# Altium PCB SuperCapCtrl.PcbDoc (part 1 of 2)
Units mil, origin at the board's own origin, x right, y up, seen from the top; angles counter-clockwise.
Board outline 2882.05 x 1582.83 mil, 4 copper layers (Top Layer, Layer 1, Layer 2, Bottom Layer), stack 23.756 mil thick; 102 components, 59 nets, 335 pads, 336 vias.
Unrouted connection lines stored in the file: 2.
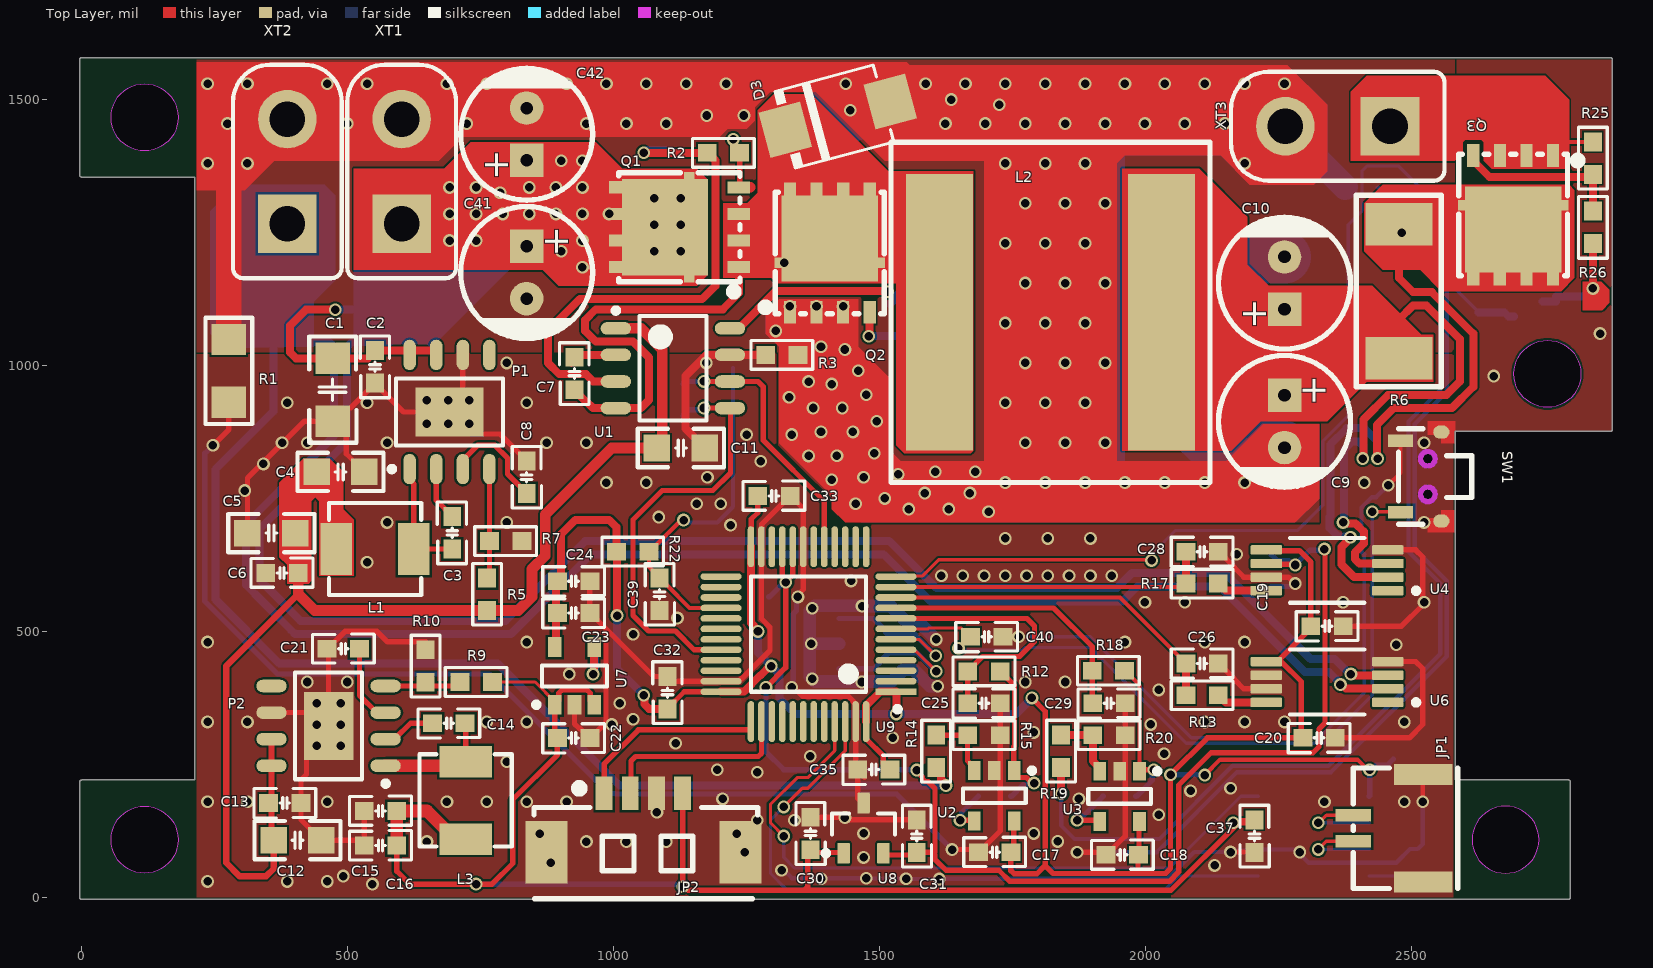
[diagram p0: Top Layer view]
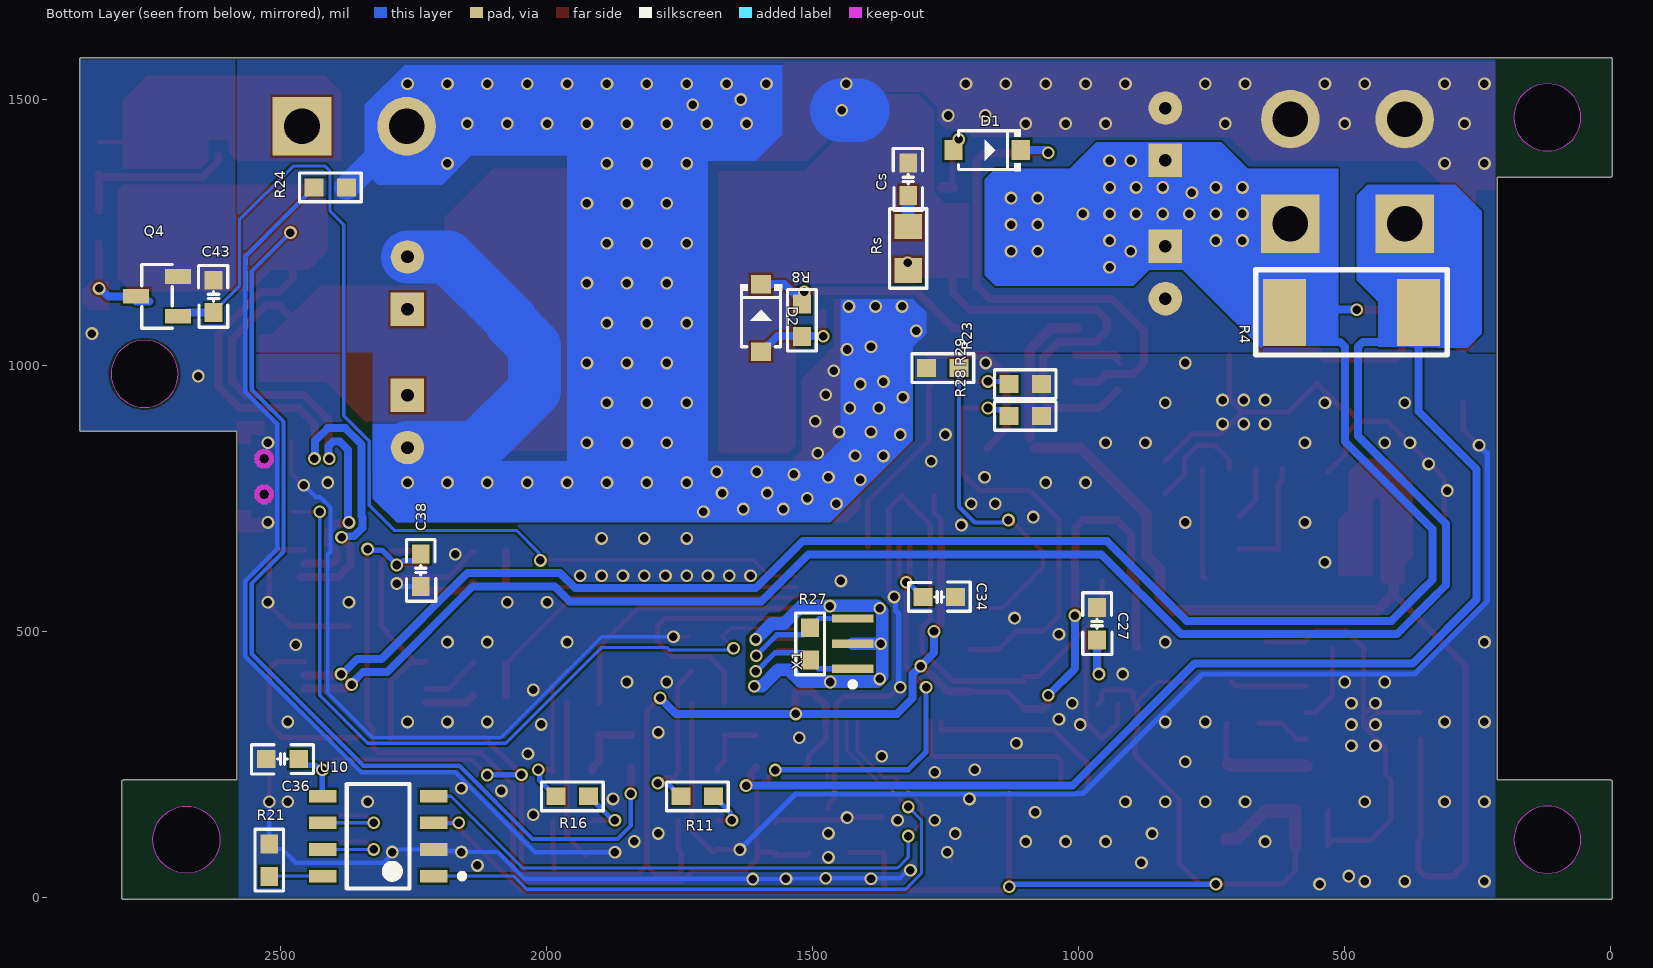
[diagram p1: Bottom Layer view, seen from below]
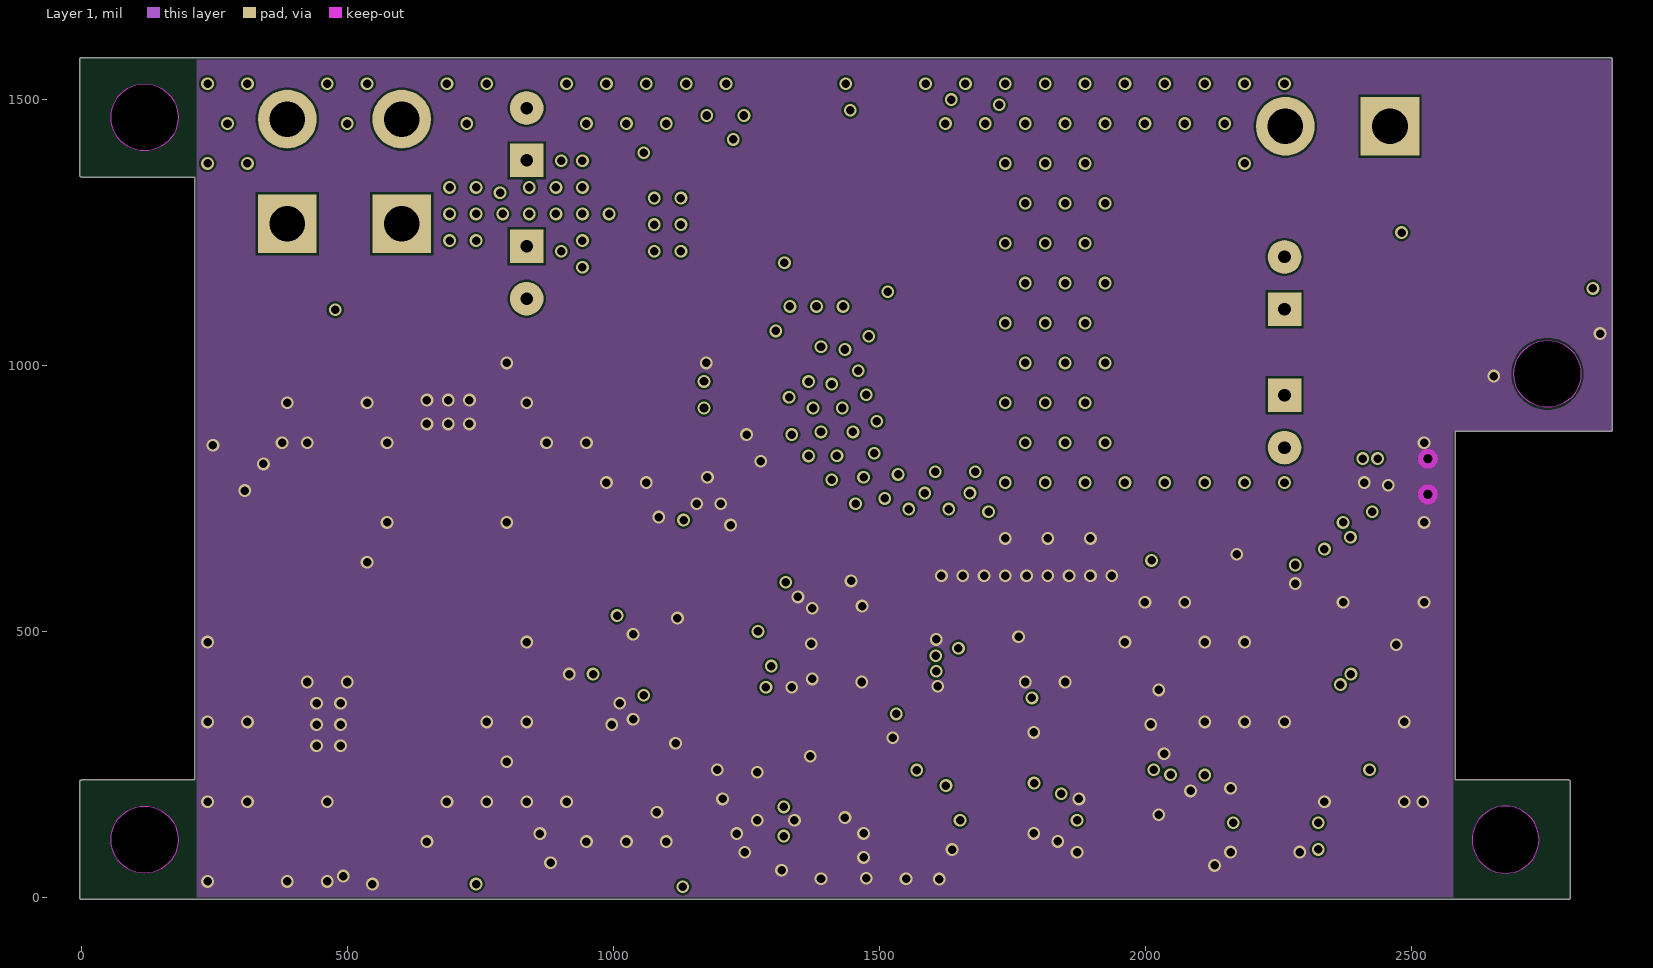
[diagram p2: Layer 1]
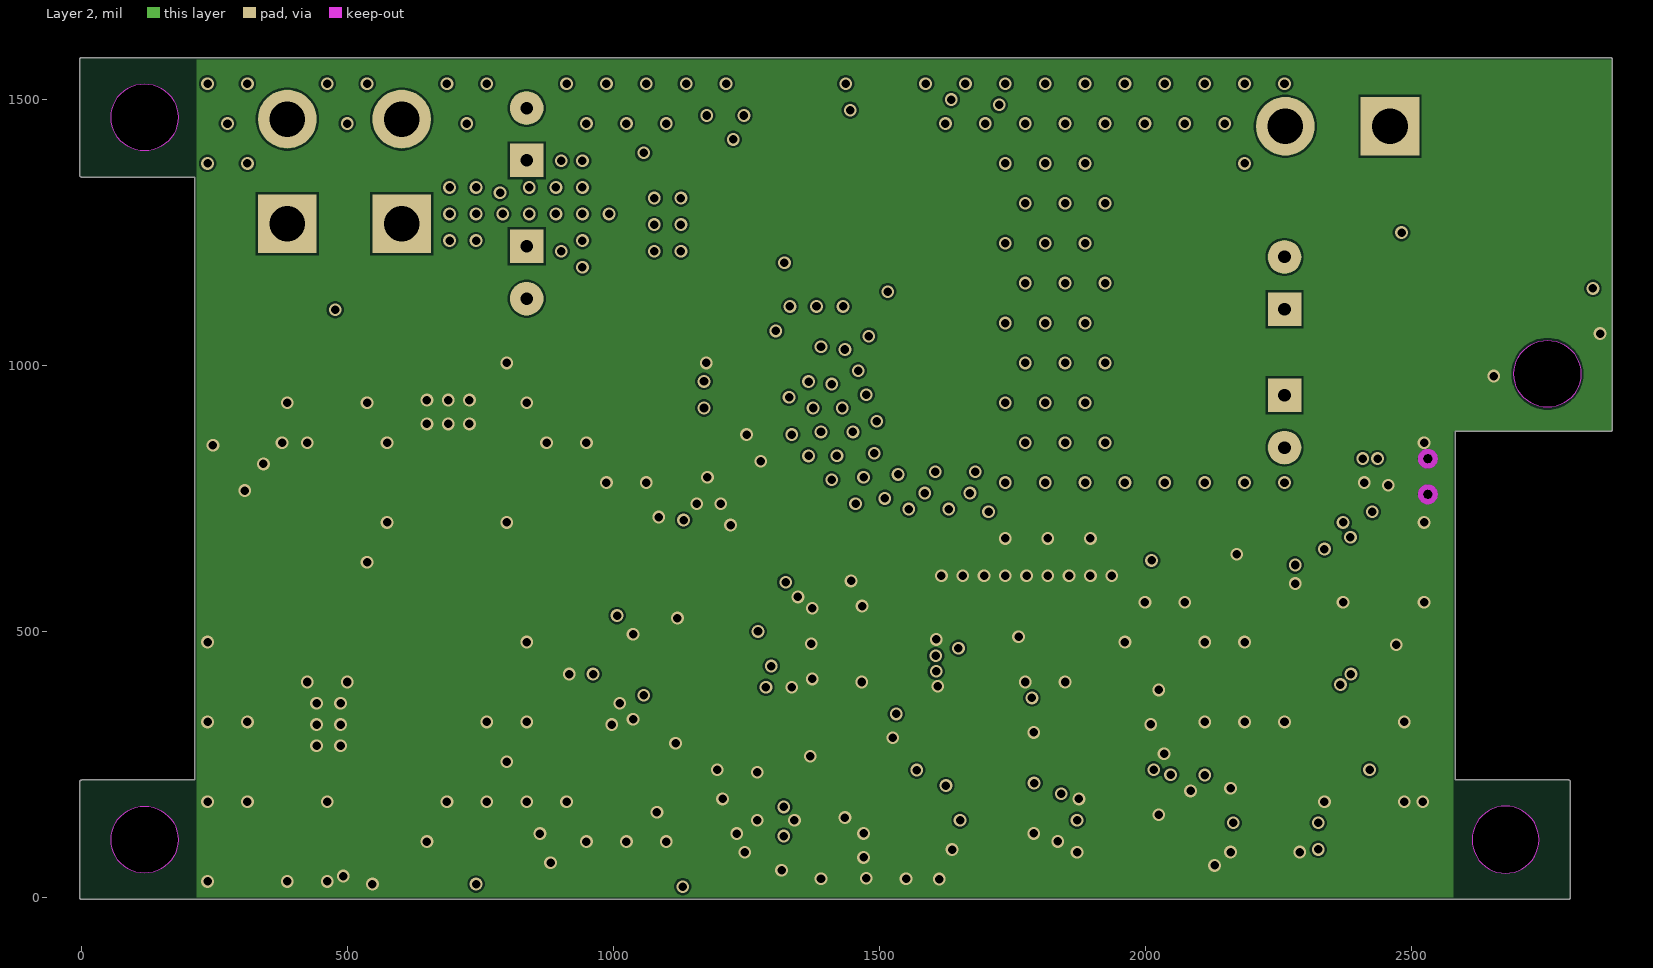
[diagram p3: Layer 2]
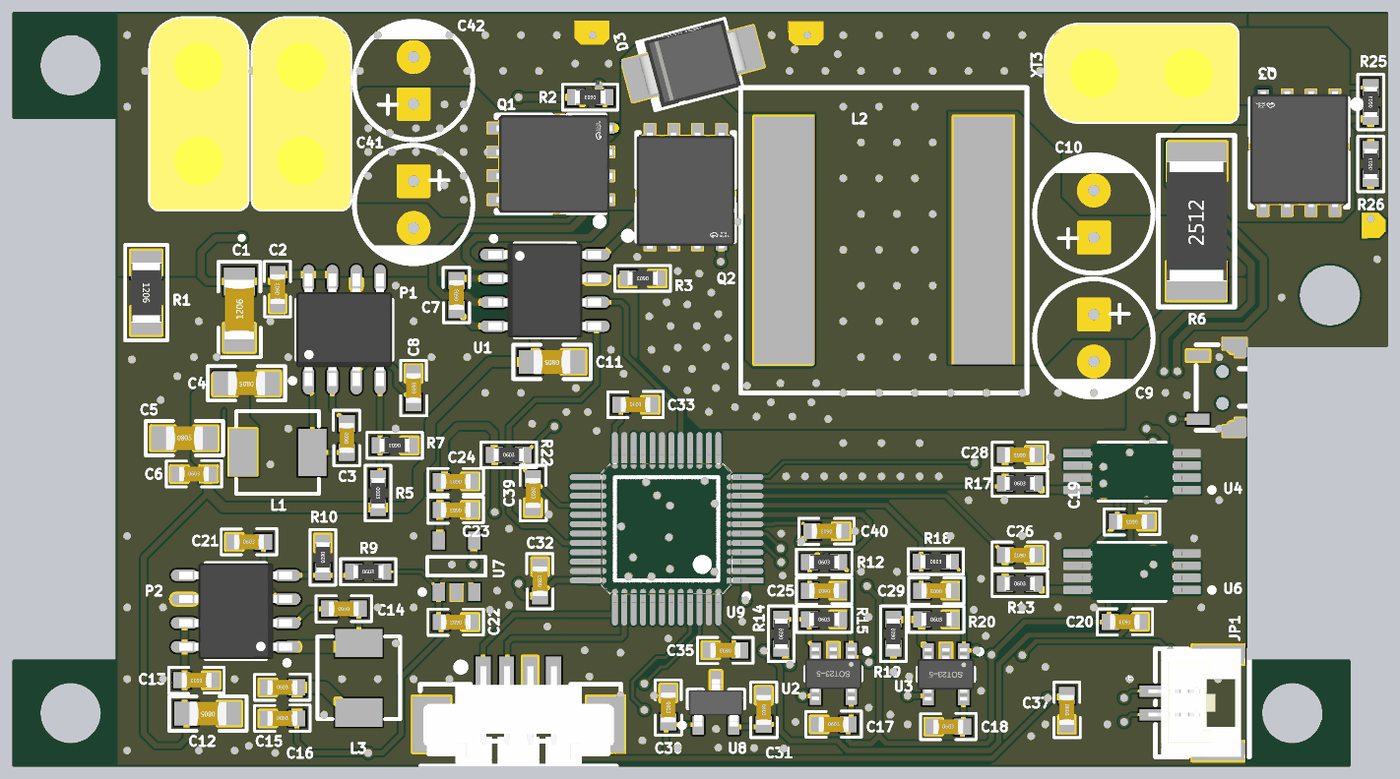
[diagram p5: 3D render of the assembled board from above, using the file's embedded part models]
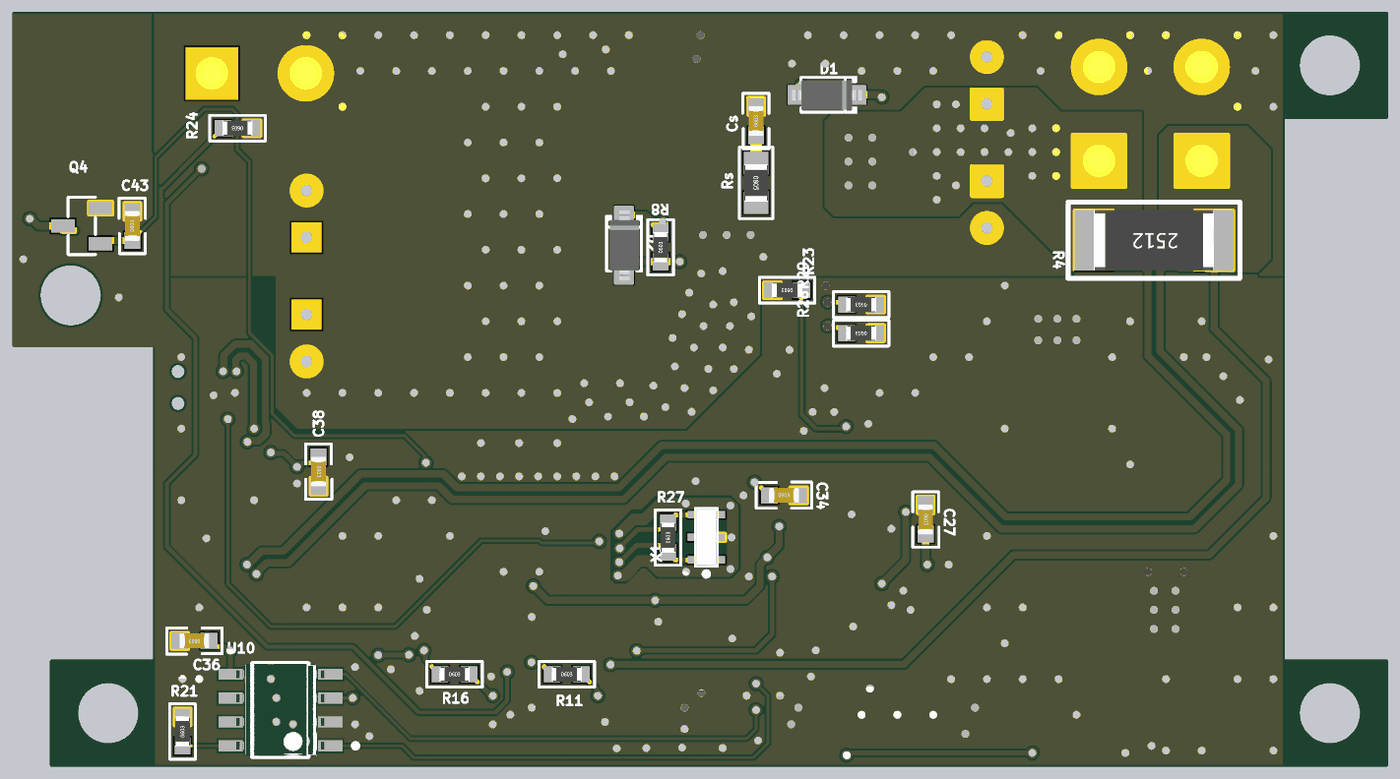
[diagram p6: 3D render of the assembled board from below, using the file's embedded part models]

## Layer stack, top to bottom
Top Solder: solder mask 0.4, Solder Resist, Dk 3.5
Top Layer: signal copper 1.4
Dielectric 2: prepreg 2.8, PP-006, Dk 4.1
Layer 1: signal copper 1.378
Dielectric 1: dielectric 12.6, FR-4, Dk 4.8
Layer 2: signal copper 1.378
Dielectric 3: prepreg 2.8, PP-006, Dk 4.1
Bottom Layer: signal copper 1.4
Bottom Solder: solder mask 0.4, Solder Resist, Dk 3.5

## Board outline
0,-4.02 cw(c0,0) -4.01,0 -4.01,216.54 cw(c0,216.54) 0,220.55 212.52,220.55 212.52,1354.25 0,1354.25 cw(c0,1358.27) -4.01,1358.27 -4.01,1574.8 cw(c0,1574.8) 0,1578.82 2874.02,1578.82 cw(c2874.02,1574.8) 2878.03,1574.8 2878.03,880 cw(c2874.02,880) 2874.02,875.98 2582.76,875.98 2582.76,220.55 2795.28,220.55 cw(c2795.28,216.54) 2799.29,216.54 2799.29,0 cw(c2795.28,0) 2795.28,-4.02
cut-out: 2755.91,921.26 cw(c2755.91,984.25) 2692.91,984.25 cw(c2755.91,984.25) 2755.91,1047.24 cw(c2755.91,984.25) 2818.9,984.25 cw(c2755.91,984.25)
cut-out: 2614.17,108.27 ccw(c2677.17,108.27) 2677.17,45.28 ccw(c2677.17,108.27) 2740.16,108.27 ccw(c2677.17,108.27) 2677.17,171.26 ccw(c2677.17,108.27)
cut-out: 118.11,1403.54 cw(c118.11,1466.54) 55.12,1466.54 cw(c118.11,1466.54) 118.11,1529.53 cw(c118.11,1466.54) 181.1,1466.54 cw(c118.11,1466.54)
cut-out: 118.11,45.28 cw(c118.11,108.27) 55.12,108.27 cw(c118.11,108.27) 118.11,171.26 cw(c118.11,108.27) 181.1,108.27 cw(c118.11,108.27)

## Design rules (kind name [scope] priority, off if disabled: settings)
Clearance [All] p1: gap=4 ignorepadtopadclearanceinfootprint=FALSE
DiffPairsRouting [All] p1: maxlimit=10 minlimit=10 mostfreqgap=10 toplayer_minwidth=4 toplayer_maxwidth=2222 toplayer_prefwidth=15 midlayer1_minwidth=4 midlayer1_maxwidth=2222 midlayer1_prefwidth=15 midlayer2_minwidth=4 midlayer2_maxwidth=2222 midlayer2_prefwidth=15 bottomlayer_minwidth=4 bottomlayer_maxwidth=2222 bottomlayer_prefwidth=15 maxuncoupledlength=500
HoleSize [All] p1: absolutevalues=TRUE maxlimit=44444 minlimit=1 maxpercent=80.000 minpercent=20.000
MinimumSolderMaskSliver [All] p1: minsoldermaskwidth=4
PolygonConnect [All] p1: connectstyle=Direct reliefconductorwidth=10 reliefentries=4 polygonreliefangle="90 Angle" airgapwidth=10
RoutingVias [All] p1: holewidth=15.75 width=23.62 viastyle="Through Hole" minholewidth=15.75 minwidth=23.62 maxholewidth=28 maxwidth=50
SilkToSilkClearance [All] p1: silktosilkclearance=0
SilkToSolderMaskClearance [IsPad] p1: minsilkscreentomaskgap=0 clearancetoexposedcopper=TRUE
SolderMaskExpansion [All] p1: expansion=4 istentingtop=FALSE
SupplyNets "Schematic Supply Nets_9" [InNet('VCAP')] p1: voltage=0.000
SupplyNets "Schematic Supply Nets_8" [InNet('IB_N')] p2: voltage=0.000
SupplyNets "Schematic Supply Nets_6" [InNet('PGND')] p3: voltage=0.000
SupplyNets "Schematic Supply Nets_5" [InNet('REF3V3')] p4: voltage=0.000
SupplyNets "Schematic Supply Nets_4" [InNet('IB_P')] p5: voltage=0.000
SupplyNets "Schematic Supply Nets_3" [InNet('12V0')] p6: voltage=0.000
SupplyNets "Schematic Supply Nets_2" [InNet('3V3')] p7: voltage=0.000
SupplyNets "Schematic Supply Nets_1" [InNet('5V0')] p8: voltage=0.000
SupplyNets "Schematic Supply Nets" [InNet('GND')] p9: voltage=0.000
Width [All] p1: maxlimit=11111 minlimit=4 preferedwidth=10
25 further rules are at their usual default settings.

## Classes and differential pairs
component class PwrObj: C1 C2 C3 C4 C5 C6 C7 C8 C9 C10 C11 C12 C13 C14 C15 C16 C17 C18 C19 C20 C21 C22 C23 C24 C25 C26 C27 C28 C29 C30 C31 C41 C42 C43 Cs D1 D2 D3 L1 L2 L3 P1 P2 Q1 Q2 Q3 Q4 R1 R2 R3 R4 R5 R6 R7 R8 R9 R10 R11 R12 R13 R14 R15 R16 R17 R18 R19 R20 R24 R25 R26 R28 R29 Rs U1 U2 U3 U4 U6 U7 U8 XT1 XT2 XT3
component class MainCtrl: C32 C33 C34 C35 C36 C37 C38 C39 C40 JP1 JP2 R21 R22 R23 R27 SW1 U9 U10 X1
differential pair IC: +IC_P -IC_N
differential pair IB: +IB_P -IB_N

## Components (designator, comment, footprint, x,y, rotation, side; value= is the part's Value field where it differs from the comment)
C1 "22uF" 1206M 471.54,954.45 r90 top
C2 "100nF" 0603M 551.54,997.37 r90 top
C3 "100nF" 0603M 696.54,685.32 r90 top
C4 "10uF" 0805M#1 486.54,799.8 r180 top
C5 "10uF" 0805M#1 356.54,684.8 r0 top
C6 "100nF" 0603M 376.54,609.8 r0 top
C7 "220nF" 0603M 926.54,984.8 r90 top
C8 "2.2uF" 0603M 836.54,789.8 r270 top
C9 "220uF/35V" D6.3*L12 2261.54,894.8 r270 top
C10 "220uF/35V" D6.3*L12 2261.54,1154.8 r90 top
C11 "10uF" 0805M#1 1126.54,844.8 r180 top
C12 "10uF" 0805M#1 405.68,107.3 r180 top
C13 "100nF" 0603M 381.75,177.3 r180 top
C14 "100nF" 0603M 690.25,327.3 r180 top
C15 "10uF" 0603M 561.75,162.3 r0 top
C16 "100nF" 0603M 561.75,97.3 r0 top
C17 "100nF" 0603M 1716.54,84.8 r0 top
C18 "100nF" 0603M 1956.54,79.8 r0 top
C19 "100nF" 0603M 2341.54,509.8 r180 top
C20 "100nF" 0603M 2326.54,299.8 r180 top
C21 "2.2uF" 0603M 491.75,467.3 r0 top
C22 "10uF" 0603M 924.84,299.4 r180 top
C23 "10uF" 0603M 924.84,534.4 r180 top
C24 "100nF" 0603M 924.84,594.4 r180 top
C25 "3.3nF" 0603M 1696.54,364.8 r180 top
C26 "3.3nF" 0603M 2106.54,439.8 r180 top
C27 "22nF" 0603M 964.84,514.4 r270 bottom
C28 "3.3nF" 0603M 2106.54,649.8 r180 top
C29 "3.3nF" 0603M 1931.54,364.8 r180 top
C30 "100nF" 0603M 1370,120 r270 top
C31 "100nF" 0603M 1570,115 r270 top
C32 "100nF" 0603M 1101.54,384.8 r90 top
C33 "100nF" 0603M 1301.54,754.8 r0 top
C34 "100nF" 0603M 1261.54,564.8 r180 bottom
C35 "100nF" 0603M 1489.49,240 r180 top
C36 "100nF" 0603M 2496.54,259.8 r0 bottom
C37 "100nF" 0603M 2205,115 r270 top
C38 "100nF" 0603M 2236.54,614.8 r270 bottom
C39 "100nF" 0603M 1086.54,569.8 r270 top
C40 "100nF" 0603M 1701.54,489.8 r180 top
C41 "220uF/35V" D6.3*L12 836.54,1174.8 r270 top
C42 "220uF/35V" D6.3*L12 836.54,1434.8 r90 top
C43 "100nF" 0603M 2626.54,1129.8 r90 bottom
Cs "100nF" 0603M 1320,1350 r90 bottom
D1 "1N4148W" SOD-123 1171.54,1404.8 r180 bottom
D2 "1N4148W" SOD-123 1596.78,1089.44 r90 bottom
D3 "NHS-D-SMD" SMB 1421.54,1469.8 r195 top
JP1 "NHS-1.25Conn-2p" GH1.25-2p-LT 2456.54,129.8 r90 top
JP2 "NHS-1.25Conn-4p" MX1.25-WT 1056.54,84.8 r0 top
L1 "HCMA-0420-100-M" 0420 551.54,654.8 r180 top
L2 "XAL1510-103MED" "New footprint 1" 1821.54,1099.8 r0 top
L3 "HCMA-0420-100-M" 0420 721.75,182.3 r270 top
P1 "JW5015A" SOP127P600X170_HS-9N 691.54,912.52 r90 top
P2 "JW5015A" SOP127P600X170_HS-9N 464.04,322.3 r180 top
Q1 "SiR182DP" "Copy of FAIR-SOT23-3_V" 1096.54,1259.8 r90 top
Q2 "SiR182DP" "Copy of FAIR-SOT23-3_V" 1406.54,1238.76 r0 top
Q3 "NHS-PMOS-PowerPAK_SO-8" "Copy of FAIR-SOT23-3_V" 2691.54,1255.84 r180 top
Q4 "SOT-23_NMOS" SOT-23 2731.54,1129.8 r180 bottom
R1 "0" 1206M 276.54,989.8 r270 top
R2 "10" 0603M 1206.54,1399.8 r180 top
R3 "0" 0603M 1316.54,1019.8 r180 top
R4 "2mR" 2512M 486.54,1099.8 r0 bottom
R5 "182k" 0603M 762.04,569.8 r270 top
R6 "1mR" 2512M 2476.54,1139.8 r90 top
R7 "13k" 0603M 797.04,669.8 r180 top
R8 "10" 0603M 1520,1085 r90 bottom
R9 "118k" 0603M 741.54,404.8 r0 top
R10 "22k" 0603M 646.54,434.8 r270 top
R11 "0" 0603M 1716.54,189.8 r180 bottom
R12 "1k" 0603M 1696.54,424.8 r0 top
R13 "1k" 0603M 2106.54,379.8 r0 top
R14 "825k" 0603M 1606.54,274.8 r90 top
R15 "100k" 0603M 1696.54,304.8 r0 top
R16 "0" 0603M 1951.54,189.8 r180 bottom
R17 "1k" 0603M 2106.54,589.8 r0 top
R18 "1k" 0603M 1930.46,425.88 r0 top
R19 "825k" 0603M 1841.54,274.8 r90 top
R20 "100k" 0603M 1931.54,304.8 r0 top
R21 "0" 0603M 2521.54,69.8 r90 bottom
R22 "10k" 0603M 1036.03,649.8 r0 top
R23 "10kNTC" 0603M 1255,995 r0 bottom
R24 "0" 0603M 2406.54,1334.8 r0 bottom
R25 "47k" 0603M 2841.54,1389.8 r90 top
R26 "47k" 0603M 2841.54,1259.8 r90 top
R27 "402k" 0603M 1504.43,476.38 r90 bottom
R28 "47k" 0603M 1100,905 r0 bottom
R29 "47k" 0603M 1100,965 r0 bottom
Rs "47k" 0805M#2 1320,1220 r270 bottom
SW1 "TS24CA" TS24CA-Footprint-1 2530.43,791.66 r270 top
U1 "MP1923GS" SOIC127P600X175-8N 1111.54,994.8 r0 top
U2 "AD8605ARTZ-REEL" ADI-RJ-5_L 1715.83,190.84 r270 top
U3 "AD8605ARTZ-REEL" ADI-RJ-5_L 1951.54,189.8 r270 top
U4 "INA240A1PWR" FP-PW0008A-MFG 2341.54,614.8 r180 top
U6 "INA240A3PWR" FP-PW0008A-MFG 2341.54,404.8 r180 top
U7 "RT9013-33GB" SOT95P279X130-5N 926.54,416.24 r90 top
U8 "REF3033AIDBZT" DBZ0003A_N 1470,130 r90 top
U9 "STM32G431CBT6" FP-LQFP48-5B-IPC_A 1366.54,494.8 r180 top
U10 "TJA1044GT/3Z" FP-SOT96-1-MFG 2316.54,114.8 r0 bottom
X1 "16M" MURA-CSTCE_G_A-3_V 1424.41,476.93 r90 bottom
XT1 "XT30F" XT30F 601.54,1364.8 r90 top
XT2 "XT30M" XT30F 386.54,1364.8 r90 top
XT3 "XT30M" XT30F 2361.54,1449.8 r180 top

## Footprints (in the part's own frame and the unit in brackets; to place one, negate y for a bottom-side part, rotate by r counter-clockwise, add the part's x,y. Pads: shape width x height; smd on the part's side, far side on the other; paste and mask are expansions set on the pad)
0420 [mm]
  rect 1.5x2.5 smd: 1(-1.85,0) 2(1.85,0)
  silkscreen extent -2.2,-2.2 2.2,2.2, body extent -2.2,-2.2 2.2,2.2, height 2
0603M [mm]
  rect 0.9x0.85 smd: 1(-0.775,0) 2(0.775,0)
  silkscreen extent -1.48,-0.69 1.48,0.71, body extent -0.8,-0.4 0.8,0.4, height 0.8
0805M#1 [mil]
  rect 50x50 smd: 1(-45,0) 2(45,0)
  silkscreen extent -81,-36 81,36, body extent -39,-26 39,26, height 51
0805M#2 [mil]
  rect 47.24x51.18 smd: 1(-41.34,0) 2(41.34,0)
  silkscreen extent -75,-35 75,35, body extent -39,-25 39,25, height 20
1206M [mm]
  rect 1.5x1.65 smd: 1(-1.5,0) 2(1.5,0)
  silkscreen extent -2.54,-1.14 2.54,1.12, body extent -1.6,-0.8 1.6,0.8, height 1.1
2512M [mm]
  rect 2.032x3.2 smd: 1(-3.2,0) 2(3.2,0)
  silkscreen extent -4.57,-2.03 4.57,2.03, body extent -3.2,-1.6 3.2,1.6, height 0.56
ADI-RJ-5_L [mm] "SOT-23, 5-Leads, Body 2.9x1.6mm, Pitch 0.95mm, IPC High Density"
  rect 0.9x0.6 smd: 1(-1.2,0.95) 2(-1.2,0) 3(-1.2,-0.95) 4(1.2,-0.95) 5(1.2,0.95)
  silkscreen extent -1.32,-1.5 0.35,1.93, body extent -1.4,-1.5 1.4,1.5, height 1.15
"Copy of FAIR-SOT23-3_V" [mm] "SOT23, 3-Leads, Body 3.12x1.5mm, Pitch 0.95mm"
  rect 0.95x0.5 smd paste-100 mask+0.05: D(-2.169,-1.16) D(2.169,-1.16)
  rect 0.58x1.08 smd paste-100 mask+0.05: D(-1.9,2.14) D(-0.63,2.14) D(0.64,2.14) D(1.91,2.14)
  rect 4.6x4.1 smd paste-100 mask+0.05: D(0,0)
  rect 0.58x1.079 smd paste-100 mask+0.05: G(1.905,-3.53) S(-1.905,-3.53) S(-0.635,-3.53) S(0.635,-3.53)
  silkscreen extent -3.2,-3.59 2.6,2.21, body extent -2.68,-3.96 2.67,2.19, height 1.12
D6.3*L12 [mm]
  rect 1.6x1.6 hole 0.6: 1(-1.25,0)
  round 1.6 hole 0.6: 2(1.25,0)
  silkscreen extent -3.15,-3.15 3.15,3.15, body extent -3.05,-3.05 3.15,3.05, height 12
DBZ0003A_N [mm] "SOT23, 3-Leads, Body 3.04x1.4mm, Pitch 0.95mm, IPC Medium Density"
  rrect17% 1x0.6 smd: 1(-1.2,0.95) 2(-1.2,-0.95) 3(1.2,0)
  silkscreen extent -1.32,-1.5 0.7,1.92, body extent -1.26,-1.46 1.26,1.46, height 0.96
FP-LQFP48-5B-IPC_A [mm]
  rect 1.955x0.312 smd paste+0 mask+0: 1(-4.175,2.75)
  rrect100% 1.955x0.312 smd paste+0 mask+0: 2(-4.175,2.25) 3(-4.175,1.75) 4(-4.175,1.25) 5(-4.175,0.75) 6(-4.175,0.25) 7(-4.175,-0.25) 8(-4.175,-0.75) 9(-4.175,-1.25) 10(-4.175,-1.75) 11(-4.175,-2.25) 12(-4.175,-2.75) 25(4.175,-2.75) 26(4.175,-2.25) 27(4.175,-1.75) 28(4.175,-1.25) 29(4.175,-0.75) 30(4.175,-0.25) 31(4.175,0.25) 32(4.175,0.75) 33(4.175,1.25) 34(4.175,1.75) 35(4.175,2.25) 36(4.175,2.75)
  rrect100% 0.312x1.955 smd paste+0 mask+0: 13(-2.75,-4.175) 14(-2.25,-4.175) 15(-1.75,-4.175) 16(-1.25,-4.175) 17(-0.75,-4.175) 18(-0.25,-4.175) 19(0.25,-4.175) 20(0.75,-4.175) 21(1.25,-4.175) 22(1.75,-4.175) 23(2.25,-4.175) 24(2.75,-4.175) 37(2.75,4.175) 38(2.25,4.175) 39(1.75,4.175) 40(1.25,4.175) 41(0.75,4.175) 42(0.25,4.175) 43(-0.25,4.175) 44(-0.75,4.175) 45(-1.25,4.175) 46(-1.75,4.175) 47(-2.25,4.175) 48(-2.75,4.175)
  silkscreen extent -4.38,-2.75 2.75,3.71, body extent -5.65,-5.65 5.65,5.65, height 0.25
FP-PW0008A-MFG [mm]
  rrect22% 1.5x0.45 smd paste+0 mask+0: 1(-2.9,0.975) 2(-2.9,0.325) 3(-2.9,-0.325) 4(-2.9,-0.975) 5(2.9,-0.975) 6(2.9,-0.325) 7(2.9,0.325) 8(2.9,0.975)
  silkscreen extent -4.38,-1.55 1.78,1.55, body extent -3.75,-1.8 3.75,1.8, height 0.25
FP-SOT96-1-MFG [mm]
  rect 1.3x0.6 smd paste+0 mask+0: 1(-2.65,1.905) 2(-2.65,0.635) 3(-2.65,-0.635) 4(-2.65,-1.905) 5(2.65,-1.905) 6(2.65,-0.635) 7(2.65,0.635) 8(2.65,1.905)
  silkscreen extent -4.12,-2.5 1.5,2.5, body extent -3,-2.45 3,2.45, height 1.75
GH1.25-2p-LT [mm]
  rect 1x2.8 smd: 0(-2.575,-1.675) 0(2.575,-1.675)
  rect 0.6x1.7 smd: 1(0.625,1.675) 2(-0.625,1.675)
  silkscreen extent -2.87,-3.33 2.87,1.68, body extent -2.88,-2.88 2.88,2.08, height 4.06
MURA-CSTCE_G_A-3_V [mm] "SMD, 3-Leads, Body 3.2x1.3mm, Pitch 1.2mm"
  rect 0.4x2 smd: 1(-1.2,0) 2(0,0) 3(1.2,0)
  silkscreen extent -2.07,-0.12 -1.83,0.13, body extent -1.6,-0.65 1.6,0.65, height 0.7
MX1.25-WT [mm]
  rect 2x3 smd: 0(-4.632,0) 0(4.632,0)
  rect 0.8x1.6 smd: 1(-1.889,2.811) 2(-0.639,2.811) 3(0.611,2.811) 4(1.861,2.811)
  silkscreen extent -5.23,-2.23 5.45,3.25, body extent -5.07,-2.1 5.08,3.09, height 3.4
"New footprint 1" [mm]
  rect 3.18x13.2 smd: 1(-5.3,0) 2(5.3,0)
  silkscreen extent -7.62,-8.13 7.62,8.13, body extent -7.49,-8 7.49,8, height 10
SMB [mil]
  rect 80.61x88.23 smd paste+2: A(-102.02,0) K(102.02,0)
  silkscreen extent -89,-75 105,75, body extent -106,-73 106,70, height 89
SOD-123 [mm]
  rect 0.88x0.96 smd paste+0.051: A(-1.61,0) K(1.61,0)
  silkscreen extent -1.38,-1 1.6,1, body extent -1.85,-0.8 1.85,0.75, height 1.18
SOIC127P600X175-8N [mm] "SOIC, 8-Leads, Body 4.90x3.90mm, Pitch 1.27mm, IPC Medium Density"
  oval 1.45x0.6 smd: 1(-2.725,1.905) 2(-2.725,0.635) 3(-2.725,-0.635) 4(-2.725,-1.905) 5(2.725,-1.905) 6(2.725,-0.635) 7(2.725,0.635) 8(2.725,1.905)
  silkscreen extent -2.85,-2.5 1.6,2.88, body extent -3,-2.5 3,2.5, height 1.75
SOP127P600X170_HS-9N [mm] "SOP, 8-Leads, Body 4.90x3.90mm, Pitch 1.27mm, Thermal Pad 3.25x2.36mm, IPC Medium Density"
  oval 1.45x0.6 smd: 1(-2.725,1.905) 2(-2.725,0.635) 3(-2.725,-0.635) 4(-2.725,-1.905) 5(2.725,-1.905) 6(2.725,-0.635) 7(2.725,0.635) 8(2.725,1.905)
  rect 2.36x3.25 smd: 9(0,0)
  silkscreen extent -2.85,-2.55 1.6,2.88, body extent -3,-2.55 3,2.55, height 1.7
SOT95P279X130-5N [mm] "SOT23, 5-Leads, Body 2.90x2.79mm, Pitch 0.95mm, IPC Medium Density"
  rect 0.95x0.65 smd mask+0.051: 1(-1.375,0.95) 2(-1.375,0) 3(-1.375,-0.95)
  rect 0.95x0.65 smd: 4(1.375,-0.95) 5(1.375,0.95)
  silkscreen extent -1.5,-1.55 0.5,1.95, body extent -0.9,-1.55 0.9,1.55, height 1.3
SOT-23 [mm]
  rect 1.25x0.7 smd: 1(0.974,-0.948) 2(0.974,0.952) 3(-1.026,0.002)
  silkscreen extent -0.75,-1.52 0.7,1.53
TS24CA-Footprint-1 [mm]
  rect 0.6x1.2 smd: 1(-1.687,-1.287) 2(1.713,-1.287)
  oval 0.63x0.78 smd: SH(-2.112,0.663) SH(2.138,0.663)
  Top Layer region: -1.587,0.663 -1.587,0.663 -1.987,0.663 -1.987,0.013 -2.637,0.013 -2.637,1.313 -1.587,1.313 -1.587,0.663
  Top Layer region: 2.663,0.013 2.013,0.013 2.013,0.663 1.613,0.663 1.613,0.663 1.613,1.313 2.663,1.313 2.663,0.013
  Keep-Out Layer board cut-out: -0.487,0.013 -0.535,0.186 -0.663,0.313 -0.837,0.359 -1.011,0.313 -1.139,0.186 -1.187,0.013 -1.187,0.013 -1.139,-0.16 -1.011,-0.287 -0.837,-0.333 -0.663,-0.286 -0.535,-0.16 -0.487,0.013
  Keep-Out Layer board cut-out: 1.213,0.013 1.165,0.186 1.037,0.313 0.863,0.359 0.689,0.313 0.561,0.186 0.513,0.013 0.513,0.013 0.561,-0.16 0.689,-0.287 0.863,-0.333 1.037,-0.286 1.165,-0.16 1.213,0.013
  Keep-Out Layer circle w0.025: c-0.837,0.013 r0.35
  Keep-Out Layer circle w0.254: c-0.837,0.013 r0.35
  Keep-Out Layer circle w0.025: c0.863,0.013 r0.35
  Keep-Out Layer circle w0.254: c0.863,0.013 r0.35
  silkscreen extent -2.26,-1.39 2.29,2.11
XT30F [mm]
  rect 2.8x2.8 hole 1.7: 1(-2.5,0)
  round 2.8 hole 1.7: 2(2.5,0)
  silkscreen extent -5.1,-2.6 5.1,2.6, body extent -5.1,-2.6 5.1,2.6, height 9.45

## Part data
C1: library part CMP-001-00098-5, "1206/35V"
C2 C3 C6 C13 C14 C16 C17 C18 C19 C20 C24 C25 C26 C27 C28 C29 C30 C31: library part CMP-001-00098-5, ".."
C4 C5 C11 C12: library part CMP-001-00098-5, "0805/25V"
C7: library part CMP-001-00098-5, "0603/25V"
C8 C21: library part CMP-001-00098-5, "0603/16V"
C9 C10 C41 C42: library part CMP-001-00105-2, "C46550432"
C15: library part CMP-001-00098-5, "0603/10V"
C22 C23: library part CMP-001-00098-5, "0603"
C32 C33 C34 C35 C36 C37 C38 C39 C40 C43 Cs: library part CMP-001-00098-4, ".."
D1 D2: library part CMP-004-00047-2, "C7420318"
D3: library part CMP-004-00047-2
JP1: library part CMP-002-00099-4, "1"
JP2: library part CMP-002-00101-3, ".."
L1 L3: library part CMP-006-00060-2, "C49190137"
L2: library part CMP-006-00052-1
P1 P2: library part CMP-019-00099-1
Q1 Q2: library part CMP-013-00061-1, "VishayNMOS", Case/Package=TO-236-3, Input Capacitance=73pF, Manufacturer=Fairchild, Max Operating Temperature=150°C, Min Operating Temperature=-55°C, Nominal Dual Supply Voltage=-50V, Package Description="3-Pin Small Outline Transistor, Body 2.92 x 1.325 mm, Pitch 0.95 mm", Package Quantity=3000, Package Reference=SOT23-3, Package Version="Rev. 12, 03/2016", Power=360mW, Datasheet URL=https://www.fairchildsemi.com/datasheets/BS/BSS84.pdf, Datasheet Version="Rev. 1.1.0, 02/2013", Elements=1, Mounting Technology=SM, Nominal Vgs=-1.7V, Packaging=TapeandReel, Pins=3, Rds On Max=10Ohm, RoHS Compliant=True, Typical Rise Time=6.3ns
Q3: library part CMP-013-00058-7, "VishayPMOS", Case/Package=TO-236-3, Input Capacitance=73pF, Manufacturer=Fairchild, Max Operating Temperature=150°C, Min Operating Temperature=-55°C, Nominal Dual Supply Voltage=-50V, Package Description="3-Pin Small Outline Transistor, Body 2.92 x 1.325 mm, Pitch 0.95 mm", Package Quantity=3000, Package Reference=SOT23-3, Package Version="Rev. 12, 03/2016", Power=360mW, Datasheet URL=https://www.fairchildsemi.com/datasheets/BS/BSS84.pdf, Datasheet Version="Rev. 1.1.0, 02/2013", Elements=1, Mounting Technology=SM, Nominal Vgs=-1.7V, Packaging=TapeandReel, Pins=3, Rds On Max=10Ohm, RoHS Compliant=True, Typical Rise Time=6.3ns
Q4: library part CMP-013-00047-5, "C22446827"
R1 R2 R3 R4 R5 R6 R7 R8 R9 R10 R11 R12 R13 R14 R15 R16 R17 R18 R19 R20 R21 R22 R24 R25 R26 R28 R29 Rs: library part CMP-009-00191-3, ".."
R23 R27: library part CMP-009-00191-3, "C49247665"
SW1: library part CMP-011-00013-1, "4.55mm卧贴按钮"
U1: library part CMP-00024-00011-1
U2 U3: library part CMP-014-00006-2, "IC OPAMP GP 1 CIRCUIT SOT23-5 General Purpose Amplifier 1 Circuit Rail-to-Rail SOT-23-5", Case/Package=SOT-23-5, Max Operating Temperature=125°C, Max Supply Voltage=5.5V, Min Operating Temperature=-40°C, Min Supply Voltage=2.7V, Pins=5
U4 U6: library part CMP-014-00007-3, "Op Amp Single Zero Drift Amplifier 5.5V 8-Pin TSSOP T/R", Case/Package=TSSOP, Max Operating Temperature=125°C, Max Supply Voltage=5.5V, Min Operating Temperature=-40°C, Min Supply Voltage=2.7V, Pins=8
U7: library part CMP-019-00071-2, "Regulator"
U8: library part CMP-019-00109-1, "50ppm/°C drift, 50µA Iq in SOT-23-3 package series voltage reference 3-SOT-23 -40 to 125", Case/Package=SOT-23, Max Operating Temperature=125°C, Max Supply Voltage=5.5V, Min Operating Temperature=-40°C, Output Current=25mA, Output Voltage=3.3V, Pins=3
U9: library part CMP-020-00041-2, "Functional Parted Symbol", Clock Frequency=48MHz, Frequency=170MHz, Max Operating Temperature=85°C, Max Supply Voltage=3.6V, Min Operating Temperature=-40°C, Min Supply Voltage=1.71V, Interface=USB, RAM Size=32kB
U10: library part CMP-015-00017-1, "CAN High Speed Transceiver 5Mbps Normal/Standby 4.75V to 5.25V 8-Pin SOIC T/R", Max Operating Temperature=150°C, Max Supply Voltage=5.25V, Min Operating Temperature=-40°C, Min Supply Voltage=4.75V
X1: library part CMP-003-00002-2, "Ceramic Resonator, 8 MHz, +/- 0.5%, 30/33/39 pF, -20 to 80 degC, 3-Pin SMD, RoHS, Tape and Reel", Case/Package=CSMD, Frequency=8MHz, Frequency Tolerance=0.5%, Load Capacitance=33pF, Manufacturer=Murata, Max Operating Temperature=80°C, Min Operating Temperature=-20°C, Package Description="3-Pin Surface Mount Device, Body 3.2 x 1.3 mm, Pitch 1.2 mm", Package Quantity=1, Package Reference=CSTCE_G_A-3, Datasheet URL=http://www.murata.com/~/media/webrenewal/support/library/catalog/products/timingdevice/ceralock/p16e.ashx, Datasheet Version=Dec-15, Impedance=40Ohm, Manufacturer URL=http://www.murata.com/, Mounting Technology=SM, Packaging=TapeandReel, Pins=3, RoHS Compliant=True, Self Resonant Frequency=8MHz, Tolerance=0.5%
XT1 XT2 XT3: library part CMP-002-00098-3, "."

## Via types
v1: diameter 24, hole 16, Top Layer to Bottom Layer, tented both sides, 336 vias

## Nets (pads, with @x,y where several pads share a name; then routed paths per layer and width w, separated by ;. In a path a pad name is that pad's centre, name@x,y a point inside that pad or via, vN(x,y) a via of type N, cw(c..) or ccw(c..) an arc to the next point about the centre after c; other vN are vias at no path point)
3V3: C17.2 C18.2 C19.2 C20.2 C23.2 C24.2 C32.1 C33.1 C35.1 C36.1 R22.1 U2.5 U3.5 U4.5 U6.5 U7.5 U9.1 U9.24 U9.36 U9.48 U10.5 | length 4429.4
  Top Layer w8: v1(2111.54,229.8) 2140.54,258.8 2398.75,258.8 2417.75,239.8 v1(2421.54,239.8)
  Top Layer w10: C32.1@1101.54,355.27 1132.8,386.54 U9.36@1202.15,386.54 ; U9.24@1258.27,659.19 1258.71,659.63 1258.71,710.76 1271.02,723.07 C33.1@1271.02,754.8 ; U9.48@1474.8,330.41 1474.8,298.08 1507.28,265.6 1507.28,251.73 1519.02,240 C35.1@1520,240 ; U2.5@1752.72,143.09 1752.72,90.86 1747.04,85.19 1747.04,50.15 1752.9,44.29 1796.03,44.29 1811.54,59.8 ; v1(1786.54,374.8) 1811.54,349.8 1811.54,59.8 ; C18.2@1986.06,79.8 1986.06,44.8 ; C18.2@1987.04,79.8 1987.99,80.75 1987.99,141.61 U3.5@1988.94,142.56 ; U4.5@2227.36,653.19 2228.72,651.83 2289.51,651.83 2311.03,630.31 C19.2@2311.03,509.8 2310.04,509.8 2300.81,500.57 2300.81,495.97 2248.03,443.19 U6.5@2227.36,443.19 2228.72,441.83 2256.64,441.83 2293.04,405.43 C20.2@2293.04,297.8 ; C20.2@2296.03,299.8 2116.54,299.8 v1(2047.29,230.55) 2047.29,54.05 2038.04,44.8 1986.06,44.8 ; 1811.54,59.8 1826.54,44.8 1986.06,44.8
  Top Layer w15: U7.5@889.13,470.37 891.73,472.97 891.73,591.8 901.54,601.6 901.54,683.22 928.12,709.8 991.54,709.8 1005.51,695.83 R22.1@1005.51,649.8 1006.54,648.78 v1(1006.54,529.8) ; v1(1056.54,379.8) 1058.11,378.23 1058.11,363.07 1066.9,354.29 C32.1@1101.54,354.29 ; U9.36@1202.15,386.54 1245.03,386.54 1276.8,418.3 1277.6,418.3 1294.1,434.8 v1(1296.54,434.8) ; U9.24@1258.27,659.19 1258.27,515.51 1271.54,502.24 v1(1271.54,499.8) ; U9.48@1474.8,330.41 1474.8,360.05 1501.28,386.54 U9.1@1530.92,386.54 ; v1(1531.54,344.8) U9.1@1531.54,385.92
  Bottom Layer w10: v1(2047.29,230.55) 2047.66,230.18 2111.16,230.18 v1(2111.54,229.8) ; U10.5@2420.87,189.8 2421.54,190.47 v1(2421.54,239.8) 2425.32,239.8 2433.59,248.07 2454.29,248.07 C36.1@2466.02,259.8
  Bottom Layer w15: v1(1006.54,529.8) 1006.54,429.8 v1(1056.54,379.8) ; v1(1271.54,499.8) 1271.54,459.8 v1(1296.54,434.8) 1311.54,419.8 1311.54,374.8 1341.54,344.8 v1(1531.54,344.8) 1756.54,344.8 v1(1786.54,374.8)
5V0: C15.2 C16.2 C22.2 C30.2 C37.1 JP2.4 L3.2 R9.2 U7.1 U7.3 U8.1 U10.3 | length 3020
  Top Layer w6: R9.2@772.04,404.8 852.34,404.8 889.13,368.01 U7.1@889.13,362.1
  Top Layer w8: v1@2175,140 2180.51,145.52 C37.1@2205,145.52
  Top Layer w10: C16.2@592.26,97.3 592.26,49.08 616.54,24.8 v1(741.54,24.8) 771.54,24.8 810.37,63.64 810.37,183.64 894.33,267.6 C22.2@894.33,299.4 889.13,304.6 U7.1@889.13,362.1 896.93,369.9 896.93,383.95 902.79,389.8 950.28,389.8 956.14,383.95 956.14,369.9 U7.3@963.94,362.1 ; JP2.4@1129.81,195.46 1130,195.27 v1(1130,20) 1133.79,20 1140.63,13.16 1358.16,13.16 ; C30.2@1365,84.29 U8.1@1430,84.29 ; C30.2@1365,84.49 1365,20 1358.16,13.16 ; v1(2165,140) v1@2170,140 ; C37.1@2205,145.52 2199.49,140 2175,140 2170,135 2048.16,13.16 1358.16,13.16
  Top Layer w24: C16.2@592.26,97.3 C15.2@592.26,162.3 649.23,162.3 702.07,109.47 L3.2@721.75,109.47
  Bottom Layer w8: v1(2165,140) 2165.1,139.9 2190.61,139.9 2190.61,138.96 U10.3@2212.2,139.8
  Bottom Layer w10: v1(741.54,24.8) 1121.41,24.8 1126.21,20 v1(1130,20)
12V0: C4.2 C5.2 C6.2 C11.2 C12.2 C13.2 L1.2 P2.7 P2.8 R5.2 U1.1 | length 2337.6
  Top Layer w10: C6.2@401.54,617.94 C5.2@401.54,684.8 ; C4.2@441.54,799.8 478.7,762.64 L1.2@478.7,654.8
  Top Layer w12: P2.7@356.75,297.3 P2.8@356.75,247.3 356.75,111.23 C12.2@360.68,107.3 360.68,53.95 346.54,39.8 296.54,39.8 271.54,64.8 271.54,434.8 407.04,570.31
  Top Layer w20: C6.2@407.04,609.8 407.04,570.31 438.06,539.29 R5.2@762.04,539.29 821.03,539.29 846.54,564.8 846.54,617.3 871.54,642.3 871.54,719.8 996.54,844.8 C11.2@1081.54,844.8 ; U1.1@1004.25,1069.8 1051.54,1069.8 1091.54,1029.8 C11.2@1091.54,864.8
ADC-IBat: C26.2 R13.1 U9.10 | length 657
  Top Layer w8: U9.10@1530.92,563.7 1952.13,563.7 2062.31,453.52 2062.31,452.54 2075.04,439.8 C26.2@2076.03,439.8
  Top Layer w15: R13.1@2076.02,379.8 C26.2@2076.03,439.8
ADC-ICap: C28.2 R17.1 U9.11 | length 607.8
  Top Layer w8: U9.11@1530.92,583.39 2069.6,583.39 R17.1@2076.02,589.8
  Top Layer w15: R17.1@2076.02,589.8 C28.2@2076.03,649.8
ADC-Temp: C39.1 R22.2 R23.1 U9.28 | length 656.8
  Top Layer w8: R22.2@1066.54,649.8 1066.54,621.07 1073.57,614.03 1073.8,614.03 1086.54,601.3 1086.54,599.33 1099.27,586.6 1100.25,586.6 1142.84,544.02 U9.28@1202.15,544.02 ; R22.2@1067.52,649.8 1123.95,706.23 1128.47,706.23 v1(1131.54,709.29)
  Bottom Layer w8: v1@1126.54,704.8 1194.82,704.8 1224.49,734.47 R23.1@1224.49,995
ADC-VBat: C25.2 R12.1 U9.8 | length 504.1
  Top Layer w10: U9.8@1530.92,524.33 1777.01,524.33 1791.54,509.8 1791.54,480.66 1763.46,452.59 1693.8,452.59 R12.1@1666.02,424.8 ; C25.2@1666.03,365.19 1666.06,365.22 R12.1@1666.02,424.8
ADC-VCap: C29.2 R18.1 U9.9 | length 506.1
  Top Layer w10: U9.9@1530.92,544.02 1827.32,544.02 1899.95,471.39 R18.1@1899.95,425.88 1899.95,365.88 C29.2@1901.03,364.8
BKIN: U9.2
BKIN2: U9.33
CAN_H: JP1.2 U10.7 | length 167.8
  Top Layer w6: v1(2325,90) 2340.19,105.19 JP1.2@2390.59,105.19
  Bottom Layer w6: v1(2325,90) 2420.67,90 U10.7@2420.87,89.8
CAN_L: JP1.1 U10.6 | length 167.5
  Top Layer w6: v1(2325,140) 2325.87,140 2340.29,154.41 JP1.1@2390.59,154.41
  Bottom Layer w6: v1(2325,140) 2420.67,140 U10.6@2420.87,139.8
CAN_RX: U9.45 U10.4 | length 1283.8
  Top Layer w6: v1(1320,115) 1295,140 1295,175 1345,225 1365,225 1415.75,275.75 U9.45@1415.75,330.41
  Bottom Layer w6: v1(1320,115) 1320,75 1340,55 2045,55 2179.8,189.8 U10.4@2212.2,189.8
CAN_TX: U9.46 U10.1 | length 1289.3
  Top Layer w6: v1(1320,170) 1355,205 1365,205 1435.43,275.43 U9.46@1435.43,330.41
  Bottom Layer w6: v1(1320,170) 1295,145 1295,45 1325,15 2037.29,15 2062.09,39.8 U10.1@2212.2,39.8
CapDownCtrl: C43.1 Q4.1 U9.12 | length 2005.5
  Top Layer w6: U9.12@1530.92,603.07 1532.13,604.28 1581.01,604.28 1611.54,634.8 2010.04,634.8 v1(2011.54,633.3)
  Bottom Layer w6: v1(2011.54,633.3) 2014.63,636.4 2014.63,647.9 2056.54,689.8 2286.54,689.8 2333.54,736.8 2333.54,857.66 2381.54,905.66 2381.54,1264.8 2407.02,1290.29 2407.02,1365.29 2416.54,1374.8 2476.54,1374.8 2577.54,1273.8 2577.54,1149.27 2626.54,1100.27 C43.1@2626.54,1099.29
  Bottom Layer w15: C43.1@2626.54,1099.29 2675.56,1099.29 2682.36,1092.49 Q4.1@2693.19,1092.49